# Altium PCB DFMM_2024.PcbDoc (part 2 of 2)
Units mil, origin at the board's own origin, x right, y up, seen from the top; angles counter-clockwise.
Board outline 3287.4 x 3929 mil, 4 copper layers (Top Layer, Top GND, Power Plane, Bottom GND/Signal), stack 23.756 mil thick; 158 components, 100 nets, 537 pads, 256 vias.
Unrouted connection lines stored in the file: 11.
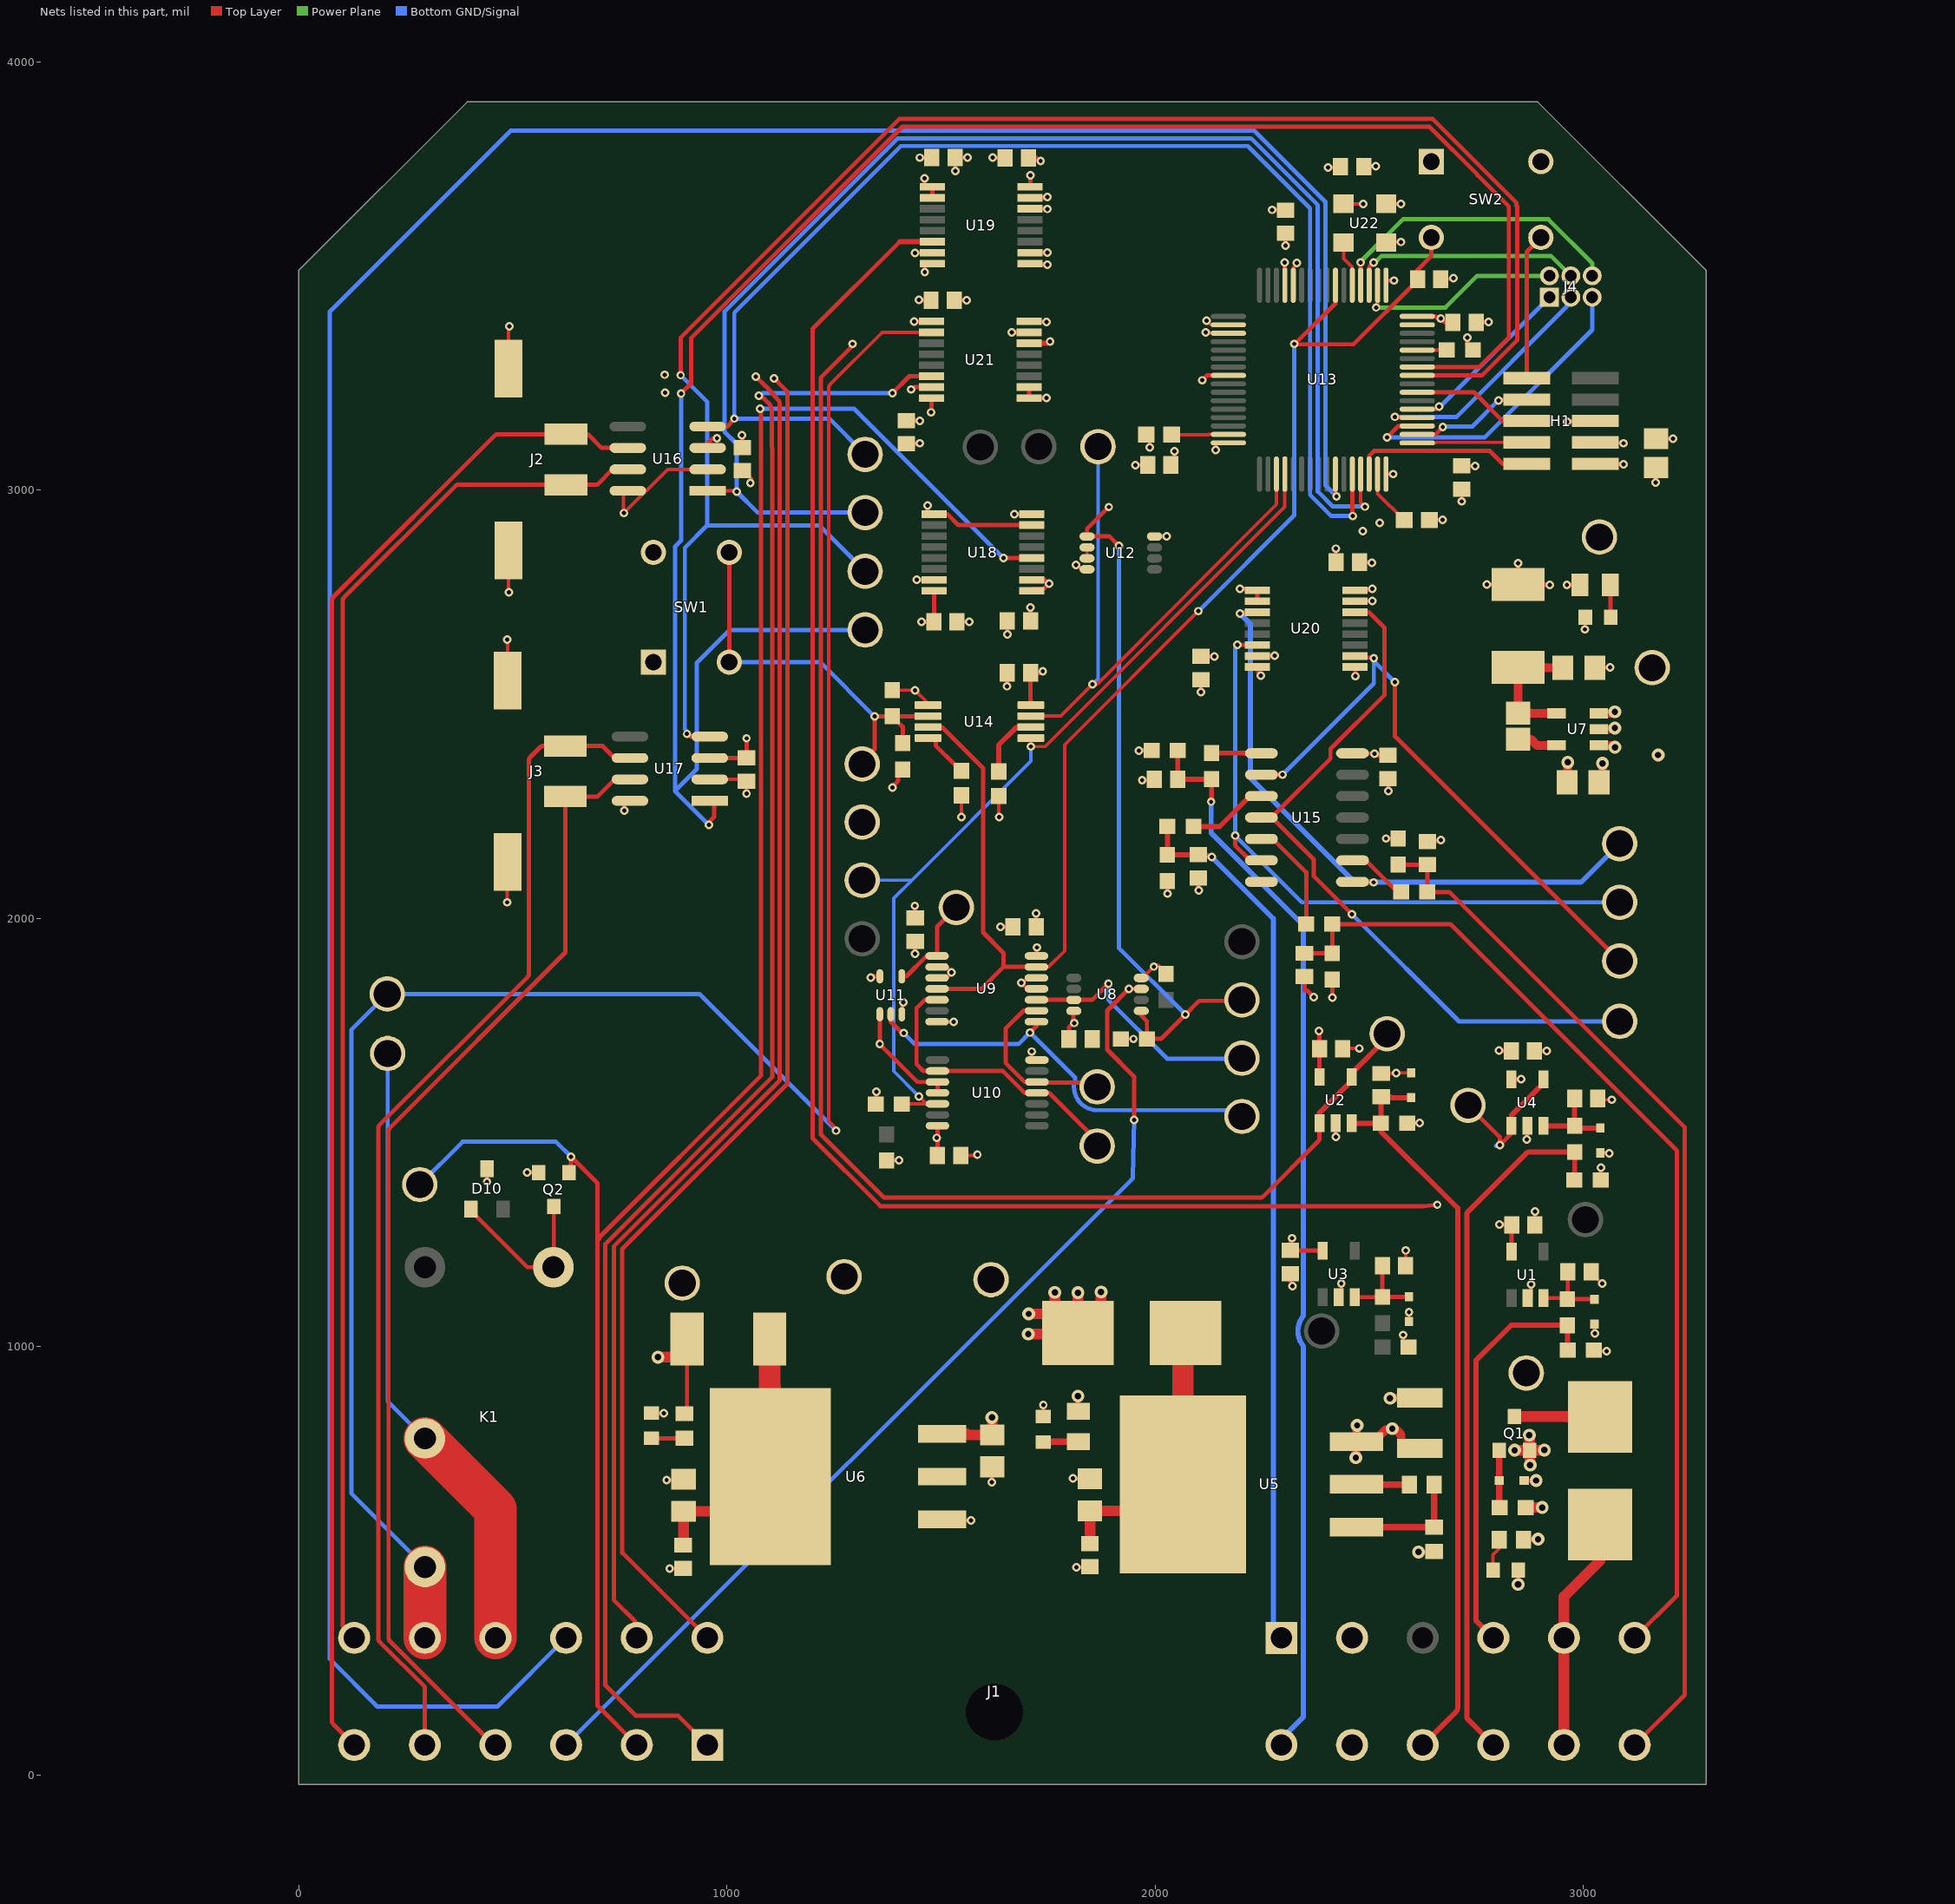
[diagram p3: the nets of this part, all layers, seen from the top]

## Via types
v1: diameter 20, hole 10, Top Layer to Bottom GND/Signal, tented both sides, 229 vias
v2: diameter 30, hole 15, Top Layer to Bottom GND/Signal, tented both sides, 26 vias
v3: diameter 30, hole 16, Top Layer to Bottom GND/Signal, tented both sides, 1 vias

## Nets (pads, with @x,y where several pads share a name; then routed paths per layer and width w, separated by ;. In a path a pad name is that pad's centre, name@x,y a point inside that pad or via, vN(x,y) a via of type N, cw(c..) or ccw(c..) an arc to the next point about the centre after c; other vN are vias at no path point) (continued)
12V_BSPD_FAULT: BSPD.1 U4.1 U4.4 U19.6 | length 4107
  Top Layer w10: 1403.49,3579.49 1200,3376 1200,1486.28 1358.77,1327.51 2625.22,1327.51 ccw(c2625.22,1337.51) 2626.2,1327.56 v1(2659,1330.78) ; BSPD.1@2731,1563 2805,1489 v1(2805,1470) 2829.28,1494.28 ccw(c2822.2,1501.34) 2831.99,1499.33 U4.1@2832.2,1515
  Top Layer w12: 1403.49,3579.49 1479.7,3579.49 U19.6@1479.83,3579.61 ; U4.1@2832.2,1515 2832.2,1539.61 2907,1614.41 U4.4@2907,1623.27
  Bottom GND/Signal w10: v1@2796.31,1468.09 2803.09,1468.09 v1(2805,1470)
12V_IMD_FAULT: IMD.1 U2.1 U2.4 U21.6 | length 3523
  Top Layer w10: v1@1293.78,3336.79 1220,3263.01 1220,1494.57 1367.05,1347.51 2245.37,1347.51 ccw(c2245.37,1357.51) 2252.42,1350.42 2381.28,1479.28 ccw(c2374.2,1486.34) 2384.2,1486.34 U2.1@2384.2,1521
  Top Layer w12: v1@1293.78,3336.79 v1(1293.78,3341) ; U21.6@1706.17,3342.39 1706.37,3342.19 1748.65,3342.19 1752.84,3346.38 v1(1755,3346.38) ; U2.1@2384.2,1521 2384.2,1545.61 2459,1620.41 U2.4@2459,1629.27 2459,1638.13 2542,1721.13 IMD.1@2542,1730
  Bottom GND/Signal w12: v1@1752.84,3346.38 v1(1755,3346.38)
12V_ROT_1_SIG: ROTR1.1 U15.8 U20.3 | length 1487.1
  Top Layer w12: v1(2198.13,2711.62) 2199.61,2713.11 2237.17,2713.11 U20.3@2238.65,2714.59 ; U15.8@2461,2085 2509.04,2085 v1(2510.35,2083.69)
  Bottom GND/Signal w12: v1(2198.13,2711.62) 2223,2686.75 2223,2326.74 2466.04,2083.69 v1(2510.35,2083.69) ; v1@2510.04,2084 2995,2084 ROTR1.1@3085,2174
12V_ROT_2_SIG: ROTR2.1 U15.6 U20.6 | length 1557.8
  Top Layer w10: v1(2187,2193) 2187,2169.83 2221.83,2135 U15.6@2248.4,2135 ; v1(2192.51,2638) 2192.7,2637.82 U20.6@2238.65,2637.82
  Bottom GND/Signal w10: ROTR2.1@3085,2037 2343,2037 v1(2187,2193) 2187,2629.78 v1@2192.51,2635.29 ; v1@2192.51,2635.29 v1(2192.51,2638) v1@2192.51,2635.29
12V_ROT_3_SIG: ROTR3.1 U15.2 U20.10 | length 1401
  Top Layer w10: U15.2@2248.4,2335 v1(2297.79,2335) ; U20.10@2467,2612.23 2491.53,2611 2491.53,2608.54 2509.09,2608.54 v1(2511,2606.62) ; v1(2560,2551) 2560,2425 ROTR3.1@3085,1900
  Bottom GND/Signal w10: v1(2297.79,2335) 2511,2548.21 v1(2511,2606.62) 2512.91,2604.71 2512.91,2598.09 v1(2560,2551)
12V_ROT_4_SIG: ROTR4.1 U15.4 U20.14 | length 1694
  Top Layer w10: U15.4@2248.4,2235 2272,2235 2409.61,2372.61 2409.61,2395.28 2536,2521.66 2536,2678 2499.41,2714.59 U20.14@2467,2714.59 U20.14@2468.3,2713.3 ; U15.4@2273,2235 2371.06,2136.94 2371.06,2097.94 v1(2460,2009)
  Bottom GND/Signal w10: v1(2460,2009) 2710,1759 ROTR4.1@3085,1759
+3V3: +3v3.1 C17.1 C18.1 C19.1 C20.1 C21.1 C22.2 C23.2 C24.2 C25.2 C28.1 C34.1 C38.1 C39.1 C43.1 C44.1 C46.1 C47.2 F4.2 H1.1 R12.2 R23.2 U8.8 U9.14 U10.14 U11.5 U12.8 U13.1 U13.13 U13.19 U13.32 U13.48 U13.64 U14.8 U16.3 U17.3 U18.1 U18.2 U18.7 U18.9 U18.15 U19.16 U20.16 U21.16 U22.1 U22.4 | length 2106.6
  Top Layer w8: U17.3@995.95,2374 U17.3@996.79,2373.17 ; v1(2118.43,3367.64) 2119.55,3366.52 2170.53,3366.52 U13.19@2171.26,3365.8 ; C47.2@2504.17,3756 v1(2515.88,3756) ; U13.48@2539.37,3037.06 2556.22,3037.06 v1(2556.28,3037) ; U22.4@2540,3577.72 2541.28,3579 v1(2574.62,3579) ; U22.1@2540,3668.28 2564.62,3668.28 2564.9,3668 v1(2574.62,3668) ; C25.2@2716,3056.33 2737.47,3056.33 2737.8,3056 v1(2747.47,3056) v1@2747.14,3056.33
  Top Layer w10: U16.3@955.06,3098 955.06,3102.02 957,3103.97 957,3110.46 966,3119.46 976,3119.46 v1(977,3120.46) ; U17.3@960.06,2374 995.95,2374 1024.36,2374 1024.53,2374.17 C38.1@1046,2374.17 v1(1046,2420) ; v1(1035,3127.88) 1036,3126.88 C34.1@1036,3099.17 ; v1(1336,1861) 1338.71,1861 1342,1864.29 U11.5@1357.41,1864.29 ; v1(1387,2305) 1387,2307 1400.43,2320.43 1400.43,2333.79 1401.2,2334.56 R23.2@1414.56,2334.56 ; C44.1@1419,3162.17 1449.31,3162.17 v1(1450.47,3161) ; C18.1@1434.41,1943 1439.66,1937.75 v1(1439.66,1917.12) ; v1(1443.3,2790) 1453.28,2790 U18.15@1483.83,2790.02 ; v1(1469.01,2963.43) 1469.01,2947.43 1472.87,2943.57 1515.01,2943.57 1540.6,2917.98 U18.7@1712.17,2917.98 ; v1(1477,3181) 1477.83,3181.83 U21.16@1477.83,3214.43 U21.16@1478,3210.57 ; C19.1@1491.83,1446 1491.83,1485.17 v1(1490,1487) 1491.86,1488.86 U10.14@1491.86,1515.23 ; C43.1@1704.17,3775 1724.33,3775 1731.33,3768 v1(1732.88,3768) ; U19.16@1708.17,3707.57 1709,3708.39 v1(1709,3735) ; v1(1709,2725.47) 1709.33,2725.14 C46.1@1709.33,2694 ; U18.1@1709.33,2761.59 U18.1@1712.17,2764.43 ; U14.8@1710.08,2497.39 1710.08,2507.24 1709.17,2508.16 C28.1@1709.17,2573 1710.17,2572 1730.62,2572 1733.09,2574.46 1735.97,2574.46 v1(1737.88,2576.38) ; U18.2@1712.17,2790.02 1742.7,2790.02 1751.21,2781.51 v1(1752.7,2781.51) 1739.48,2768.29 U18.1@1716.03,2768.29 ; v1(1722,2011.47) 1722.33,2011.14 C20.1@1722.33,1980 ; U9.14@1722.33,1915.72 ccw(c1732.33,1915.72) U9.14@1723.14,1911.77 1723.14,1930.77 v1(1724,1931.63) ; C17.1@1798.83,1718 1798.83,1744.61 v1@1809.5,1755.27 ; U8.8@1810.26,1783.61 1809.5,1782.85 v1@1809.5,1755.27 ; v1(1811,1755.27) v1@1809.5,1755.27 ; U12.8@1998.74,2891.39 1999.05,2891.7 2027.13,2891.7 v1(2027.45,2892.01) ; C23.2@2036.98,3058.5 2045.75,3067.27 v1(2045.75,3089.97) ; v1(2142,3092.98) 2142,3109.05 2142.84,3109.89 U13.32@2171.26,3109.89 ; v1(2302.8,3531.24) 2302.8,3478.35 U13.13@2303.15,3478 ; v1(2305,3570.45) C22.2@2305,3599.17 ; U20.16@2467,2765.77 2497.53,2765.77 2498.84,2767.09 2505.61,2767.09 v1(2507.53,2769) ; C39.1@2477.33,2831.41 2504.64,2831.41 v1(2506.05,2830) ; U13.1@2539.37,3442.57 2539.37,3489 2539.37,3492.84 2539.37,3489.84 2540.21,3489 v1(2558,3489) ; U13.64@2612.32,3405.05 U13.64@2612.2,3405.17 2654.54,3405.17 2657.8,3401.91 2665.2,3401.91 v1(2667.12,3400) 2668.12,3400 2677.12,3391 C24.2@2695.83,3391 ; v1(2774.99,2779) 2847.91,2779 F4.2@2848,2778.91 ; v1(2848,2828.5) F4.2@2848,2778.91 ; v1(2922,2778) 2911.92,2778 2911.01,2778.91 F4.2@2848,2778.91 ; v1(2961.88,2778) R12.2@2992.57,2778 ; H1.1@3028,3061 3093,3061 v1(3094,3060) ; v1(3169,3016.93) 3170,3017.93 C21.1@3170,3052.54
+5V: +5V.1 C15.1 F2.2 R13.1 U7.1 U7.3 | length 377.2
  Top Layer w10: R13.1@901,843 907.09,849.09 F2.2@907.09,993.57
  Top Layer w20: U7.1@3036.21,2403.6 3066.7,2403.6 3071.29,2399 v2(3074,2399) ; U7.3@3036.21,2478.4 3067.4,2478.4 3069.09,2480.09 3071.95,2480.09 v2(3073.87,2482) ; C15.1@3037,2317 3045,2325 v2(3045,2361.54)
  Top Layer w25: v2(839,975) 881,975 907.09,993.57 F2.2@907.09,1017
  other v2: 3175,2381
+12V: +12V.1 C5.2 C6.2 C7.2 C8.2 C12.1 C37.2 C40.1 C41.2 C42.2 C45.2 D10.3 F1.2 R11.2 R26.1 R27.1 R30.1 R31.1 U1.5 U2.5 U3.5 U4.5 U6.3 U15.14 U18.16 U19.1 U19.2 U19.7 U19.9 U19.15 U20.1 U20.2 U20.7 U20.9 U20.15 U21.1 U21.2 U21.7 U21.9 U21.15 | length 1854.3
  Top Layer w10: v1(440,1384.56) D10.3@440,1415.24 ; v1(1430.56,3234.6) 1433.27,3234.6 1438.7,3240.02 U21.15@1477.83,3240.02 ; v1(1437.3,3393) 1437.87,3393.57 U21.9@1477.83,3393.57 ; v1(1439.3,3553) 1440.32,3554.02 U19.7@1479.83,3554.02 ; v1(1448.28,3444) 1449.28,3443 C42.2@1477,3443 ; v1(1450.28,3775.78) 1450.5,3776 C41.2@1479,3776 ; v1(1454.45,2692) C45.2@1483.17,2692 1483.83,2692.66 U18.16@1483.83,2764.43 ; v1@1462,3728.89 1462,3711.43 1465.86,3707.57 U19.1@1479.83,3707.57 U19.2@1479.83,3681.98 ; v1@1665.67,3367.98 U21.7@1706.17,3367.98 ; U21.2@1706.17,3240.02 U21.1@1706.17,3214.43 1746.13,3214.43 v1(1746.7,3215) ; U19.9@1708.17,3528.43 1709.39,3527.22 1747.48,3527.22 v1(1748.7,3526) ; U19.15@1708.17,3681.98 1743.97,3681.98 1745.99,3684 v1(1748.7,3684) ; v2(1820,884.12) 1820,849.43 R11.2@1821,848.43 ; v1(1962.28,2391) 1963.28,2392 R27.1@1991.98,2392 ; v1(2029,2057.28) R26.1@2029,2086.98 ; C40.1@2107.03,2611.13 2107.17,2611 v1(2138.47,2611) ; v1(2198.13,2769.38) 2235.05,2769.38 U20.1@2238.65,2765.77 U20.2@2238.65,2740.18 ; U20.7@2238.65,2612.23 2278.41,2612.23 v1(2279.18,2613) ; v1(2320,1252.88) 2318.09,1250.97 2318.09,1244.09 2316,1242 C7.2@2316,1224.17 2377.88,1224.17 2378.79,1223.26 U3.5@2391.6,1223.26 ; v1(2383,1737) 2383.83,1736.17 C6.2@2383.83,1695 2383.83,1651.3 2384.2,1650.94 U2.5@2384.2,1629.27 ; v1(2414,1815) R30.1@2414,1856.98 ; U15.14@2461,2385 2461.39,2384.61 2512.13,2384.61 v1(2512.53,2384.21) 2515.23,2384.21 2519.28,2380.17 C37.2@2544,2380.17 ; U20.9@2467,2586.64 2468,2585.64 v1(2468,2565) ; U20.15@2467,2740.18 2506.71,2740.18 v1(2507.53,2741) ; v1(2539.28,2186) 2549,2186 R31.1@2568,2186.02 ; v1(2802.95,1691) 2803.95,1690 C8.2@2831.67,1690 ; v1(2803.95,1285) 2831.67,1285 C5.2@2832.67,1284 2832.67,1262.53 2832.6,1262.46 U1.5@2832.6,1221.26 ; U4.5@2832.2,1623.27 2854.28,1623.27 v1(2855.01,1624)
  Top Layer w25: U6.3@1503.09,796 1560.2,796 1562.8,793.4 C12.1@1620,793.4 1620,823 1619.96,823.04 1619.96,833.05 v2(1619,834.01) ; v2(1704,1029) F1.2@1774,1029 ; v2(1705,1076) F1.2@1776,1076 ; F1.2@1766,1105 v2(1766,1126) ; F1.2@1819.82,1031 v2(1819.82,1125.49) ; F1.2@1874,1075 v2(1874,1127)
  other v1: 1665.65,3368 1462,3727.43
+24V: +24V.1 C9.2 D9.1 Q1.2 R10.1 U5.3 | length 468.8
  Top Layer w10: R10.1@2860.54,549 2893.54,549 v2(2894.54,550) ; D9.1@2861.94,687 v2(2890,687)
  Top Layer w20: v2(2469,740.35) 2469,776.49 U5.3@2470.51,778 ; v2(2472,815.65) 2470.51,814.17 U5.3@2470.51,778 ; C9.2@2618,761.94 2587.49,761.94 2574.85,774.58 2574.85,793.76 2562.52,806.09 2555.91,806.09 v2(2554,808) 2552.09,806.09 2538.95,806.09 2510.87,778 U5.3@2470.51,778
  Top Layer w25: v2(2839.82,757.63) Q1.2@2874.43,757.63 ; v2(2874,793) 2874.43,792.57 Q1.2@2874.43,757.63 ; v2(2876,723) 2874.98,752.41 Q1.2@2874.43,757.63 ; v2(2909,758) 2908.63,757.63 Q1.2@2874.43,757.63
+24V_IN: F3.1 J1.B5 J1.B8 | length 549.8
  Top Layer w25: J1.B8@2955.04,69.39 J1.B5@2955.04,319.39 2955.04,415.98 3039,499.94 F3.1@3039,584.41
\u\R\S\T\: C29.2 H1.10 SW2.3 SW2.4 U9.4 U9.13 U13.7 U14.3 | length 3610
  Top Layer w8: U9.13@1723.14,1886.18 1751.7,1886.18 1789.1,1923.58 1789.1,2404.82 v1(2101.28,2717)
  Top Layer w10: U14.3@1469.92,2446.2 1502.42,2446.2 1598.5,2350.12 1598.5,1966.5 1646,1919 1646,1886.18 ; U9.4@1490.86,1835 1594.82,1835 1646,1886.18 ; U9.13@1723.14,1886.18 1646,1886.18 ; U13.7@2421.26,3478 2421.26,3435.52 2326.74,3341 v1(2325,3341) 2326,3340 2463.59,3340 2612.83,3489.24 C29.2@2612.83,3492 2612.83,3513.47 2645.05,3545.68 SW2.3@2645.05,3589.42 ; U13.7@2421.26,3514.27 U13.7@2422.04,3513.49 ; H1.10@2868,3261 2868,3555.46 SW2.4@2900.95,3588.42
  Bottom GND/Signal w10: v1(2101.28,2717) 2325,2940.72 v1(2325,3341)
\W\D\O\: R18.1 U10.12 U13.36 U14.5 WDO.1 | length 2100.5
  Top Layer w8: 1427.85,1566.41 1463.3,1566.41 ; v1(1449,1584) 1463.3,1569.7 1463.3,1566.41 ; U10.12@1491.86,1566.41 1463.3,1566.41 ; v1(1710,2400.76) v1@1710,2405 ; U14.5@1710.08,2420.61 1710,2420.54 v1@1710,2405 ; U13.36@2303.15,3037.06 2303.15,2960.54 1743.36,2400.76 1714.24,2400.76 v1@1710,2405
  Bottom GND/Signal w8: WDO.1@1316,2088.67 1432.07,2088.67 ; v1(1449,1584) 1390.03,1642.97 1390.03,2046.63 1432.07,2088.67 ; v1(1710,2400.76) 1710,2366.59 1432.07,2088.67
ANL_1: J1.A11 U19.14 | length 3191.7
  Top Layer w10: J1.A11@789.69,319.39 786.14,322.93 786.14,357.79 736,407.93 736,1233.46 1123.78,1621.24 1123.78,3012.21 ; v1(1067.76,3264.24) 1092.73,3240.37 1120.44,3209.54 cw(c1113,3202.86) 1123,3202.86 1123.78,3012.26 ; U19.14@1708.17,3656.39 1708.37,3656.19 1748.51,3656.19 v1(1748.7,3656)
  Bottom GND/Signal w10: v1@1747.7,3657 v1(1748.7,3656)
ANL_2: J1.A12 U19.10 | length 3236.4
  Top Layer w10: J1.A12@954.65,319.39 756,518.03 756,1228 1142,1614 1142,3224.44 1142,3224.49 ccw(c1132,3224.38) 1139.1,3231.43 1134.14,3236.41 1130.89,3239.69 v1(1110.41,3260.56) ; U19.10@1708.17,3554.02 v1(1748.7,3554)
AS_CLOSE_SDC: "SDC CLS.1" R15.1 U8.1 U12.1 U13.24 | length 1726.9
  Top Layer w10: v1(1892,2960) 1841.26,2909.26 U12.1@1841.26,2891.39 1893.7,2891.39 v1(1915.47,2869.61) ; U8.1@1967.74,1783.61 1967.74,1772.97 1981,1759.71 R15.1@1981,1718 ; R15.1@1981.98,1718 2014,1718 v1(2071,1775) 2103,1807 2203,1807 ; v1(2110,3256) 2121.37,3267.37 U13.24@2171.26,3267.37
  Bottom GND/Signal w10: v1(1915.47,2869.61) 1915.47,1930.53 v1(2071,1775)
AS_SDC_FAULT: "AS SDC FLT.1" J1.A2 Q2.1 U18.4 | length 4760.2
  Top Layer w10: 260,1376 260.5,1375.5 ; Q2.1@631.43,1405.37 636,1418.09 v1(636,1443) 698,1381 698,161.07 J1.A2@789.69,69.39 ; 702,1250.37 702,1254.37 1079.47,1631.84 1079.47,3188.18 v1(1078,3189.65) ; v1(1646,2841) 1646.2,2841.2 U18.4@1712.17,2841.2
  Bottom GND/Signal w10: 283,1378 383,1478 601,1478 v1(636,1443) ; v1(1078,3189.65) 1297.35,3189.65 v1(1646,2841)
ASSI_TX: J1.A10 U13.42 | length 7131.1
  Top Layer w10: U13.42@2421.26,3037.06 2421.26,2990.15 2423.8,2987.61 v1(2423.8,2984.91)
  Bottom GND/Signal w10: J1.A10@624.72,319.39 464.34,159 184,159 73,270 73,3416.54 495.46,3839 2231.46,3839 2398,3672.46 2398,3010.71 v1(2423.8,2984.91)
BMS_FAULT: J1.B4 R1.1 R2.2 | length 971
  Top Layer w12: J1.B4@2790.08,319.39 2749.3,360.17 2749.3,967.3 2831.5,1049.5 2944.22,1049.5 2944.29,1049.43 R1.1@2963.01,1049.43 ; R1.1@2963.01,1049.43 2963.03,1002.72 R2.2@2963.49,991
BSPD_FAULT: J1.B9 R6.1 R7.2 | length 1642.8
  Top Layer w12: J1.B9@2790.08,69.39 2731.51,127.95 cw(c2740,136.44) 2728,136.39 2728,1307.03 cw(c2740,1307.03) 2731.51,1315.51 2866.49,1450.49 cw(c2874.95,1441.98) 2874.95,1453.98 R6.1@2980,1453.98 2980,1408.23 2979.49,1407.72 R7.2@2979.49,1389
CAN1_N: J1.A7 J2.1 U16.7 | length 3225.1
  Top Layer w10: J1.A7@129.84,319.39 105.91,343.32 cw(c113,350.37) 103,350.37 103,2741.86 cw(c113,2741.86) 105.93,2748.93 366.02,3009.02 cw(c373.09,3001.95) 373.09,3011.95 J2.1@624.65,3011.95 697,3011.95 733.05,3048 758.65,3048 U16.7@753.06,3042.4
CAN1_P: J1.A6 J2.2 U16.6 | length 3550.4
  Top Layer w10: J1.A6@129.84,69.39 80.93,118.3 cw(c88,125.37) 78,125.37 78,2742.86 cw(c88,2742.86) 80.91,2749.91 458.13,3127.13 cw(c465.21,3120.06) 465.21,3130.06 J2.2@624.65,3130.06 675.65,3130.06 707.71,3098 U16.6@758.65,3098
CAN1_RX: "C1 RX.1" U13.44 U16.4 | length 3103.7
  Top Layer w10: U16.4@965.35,3148 992.76,3148 1001.05,3148 1006.9,3153.86 1016.54,3166.65 v1(1017.54,3166.65) ; U13.44@2460.63,3037.06 2460.98,3036.71 2460.98,2939.93 v1(2462,2938.91)
  Bottom GND/Signal w10: v1@1016.54,3166.65 v1@1017.54,3167.65 ; 1323,3083 1239.35,3166.65 v1(1017.54,3166.65) 1017.54,3413.68 1406.86,3803 2216.54,3803 2362,3657.54 2362,2988.72 2411.81,2938.91 v1(2462,2938.91)
CAN1_TX: "C1 TX.1" U13.45 U16.1 | length 3301.9
  Top Layer w8: U16.1@965.35,2998 1021,2998 v1(1023,2996) ; U13.45@2480.31,3037.06 2480.31,2970.69 v1(2490,2961)
  Bottom GND/Signal w10: 1323,2947 1072,2947 v1(1023,2996) 1023,3107.36 994.54,3135.82 994.54,3416.14 1399.4,3821 2224,3821 2380,3665 2380,2996.18 2414.27,2961.91 2489.09,2961.91 v1(2490,2961)
CAN2_N: J1.A4 J3.1 U17.7 | length 2647.9
  Top Layer w10: J1.A4@459.76,69.39 455.71,69.39 212.93,312.16 cw(c220,319.24) 210,319.24 210,1502.86 cw(c220,1502.86) 212.93,1509.93 623,1920 J3.1@623,2284 698.05,2284 738.05,2324 U17.7@763.65,2324
CAN2_P: J1.A5 J3.2 U17.6 | length 2741.7
  Top Layer w10: J1.A5@294.8,69.39 294.8,204.83 188.93,310.71 cw(c196,317.78) 186,317.78 186,1509.86 cw(c196,1509.86) 188.93,1516.93 535.07,1863.07 ccw(c528,1870.14) 538,1870.14 538,2368.86 cw(c548,2368.86) 540.9,2375.9 564.17,2399.17 cw(c571.25,2392.11) 571.25,2402.11 J3.2@623,2402.11 709.94,2402.11 738.05,2374 U17.6@763.65,2374
CAN2_RX: "C2 RX.1" U13.57 U17.4 | length 4287.9
  Top Layer w10: v1(892,3268) 892,3355.46 1402.54,3866 2648.45,3866 2844,3670.45 2844,3664 2846,3662 2846,3350.23 2763.14,3267.37 U13.57@2612.2,3267.37 U13.57@2612.55,3267.02 ; v1(907,2430.25) 909.71,2430.25 915.95,2424 U17.4@970.35,2424
  Bottom GND/Signal w10: v1(892,3268) 954,3206 954,2917 ; v1(907,2430.25) 905.33,2431.92 905.33,2437.67 902,2441 902,2865 954,2917 ; 1323,2810 1216,2917 954,2917
CAN2_TX: "C2 TX.1" U13.58 U17.1 | length 4721.6
  Top Layer w10: v1(893,3225) 893,3225.24 917,3249.24 917,3355 1410,3848 2640.99,3848 2752.96,3736.03 2752.96,3735.04 2826,3662 2826,3355.69 2757.37,3287.06 U13.58@2612.2,3287.06 ; v1@961.36,2227.39 970.35,2236.38 U17.1@970.35,2274
  Bottom GND/Signal w10: v1(893,3225) 893,2881.46 879,2867.46 879,2297 ; v1@959,2219 v1(958,2218) 879,2297 ; 1323,2673 1007,2673 930,2596 930,2348 879,2297
EBS_LED: J1.A3 U8.3 | length 2385.8
  Top Layer w8: v1(1939.03,1835.13) 1939.36,1834.8 U8.3@1967.74,1834.8
  Top Layer w10: v1(1939.03,1835.13) 1888.28,1784.38 1888.28,1693.05 1951,1630.33 v1(1950.98,1528.66)
  Bottom GND/Signal w10: J1.A3@624.72,69.39 1945.23,1389.89 1948.07,1392.73 ; 1948.16,1396.75 v1(1950.98,1528.66)
GND: C1.1 C2.1 C3.1 C4.1 C5.1 C6.1 C7.1 C8.1 C9.1 C10.2 C11.1 C12.2 C13.2 C14.1 C15.2 C16.2 C17.2 C18.2 C19.2 C20.2 C21.2 C22.1 C23.1 C24.1 C25.1 C26.2 C27.2 C28.2 C29.1 C30.2 C31.2 C32.1 C33.1 C34.2 C35.1 C36.1 C37.1 C38.2 C39.2 C40.2 C41.1 C42.1 C43.2 C44.2 C45.1 C46.2 C47.1 D1.2 D2.2 D3.2 D4.2 D5.2 D6.2 D7.2 D8.2 GND2.1 GND.1 H1.3 H1.5 J1.B2 J1.B11 J2.3 J2.4 J3.3 J3.4 Q2.2 R2.1 R3.1 R5.1 R7.1 R9.2 R14.1 R15.2 R16.2 R17.2 R18.2 R24.1 R25.1 SW1.1 SW1.2 SW2.1 SW2.2 U1.2 U2.2 U3.2 U4.2 U6.1 U7.2 U8.4 U9.2 U9.3 U9.7 U9.11 U9.12 U10.7 U11.3 U12.4 U13.12 U13.18 U13.63 U14.1 U15.7 U16.2 U16.8 U17.2 U17.8 U18.8 U19.8 U20.8 U21.8 U22.2 | length 4215.4
  Top Layer w8: v1(487,2037) 487,2129.69 J3.4@488.35,2131.05 ; v1(487.2,2650.87) 488.35,2649.72 J3.3@488.35,2555.06 ; J2.4@490,2859 490,2762 v1(491,2761) ; J2.3@490,3283.02 490,3380 v1(492,3382) ; v1(533.82,1406) 559.94,1406 Q2.2@560.57,1405.37 ; U16.8@758.65,2998 758.65,2947.35 v1(760,2946) 862,3048 U16.2@965.35,3048 ; v1(761,2251.54) 761,2271.35 U17.8@763.65,2274 ; D7.2@824,844.57 824.57,844 v1(852.72,844) ; v1(859.46,688) 897.2,688 C13.2@899,689.8 ; v1(866.53,481) 867.2,481.67 C14.1@898,481.67 ; U17.2@960.06,2324 1041.83,2324 1050,2315.83 1046,2311.83 v1(1046,2291.12) ; C34.2@1036,3044.83 1038.76,3044.83 1057.18,3026.41 1057.18,3018.3 v1(1055,3016.12) ; R18.2@1347.98,1566 1347.98,1593.69 v1(1349,1594.72) ; R17.2@1373,1433.98 1374.02,1435 v1(1401.72,1435) ; R24.1@1386,2532.51 1439.1,2532.51 v1(1439.62,2531.99) 1469.37,2502.24 U14.1@1469.92,2497.39 ; U11.3@1408.59,1775.71 1410.07,1777.19 1410.07,1801.47 v1(1412.03,1803.43) ; v1(1462.35,3508.57) 1462.35,3523.57 1467.21,3528.43 U19.8@1479.83,3528.43 U19.8@1502.62,3523.57 ; U9.7@1490.86,1758.23 1491,1758.09 1529.28,1758.09 v1(1529.42,1757.95) ; U9.3@1490.86,1860.59 1512.19,1860.59 1516.92,1865.32 1518.2,1865.32 1521.83,1868.95 1521.83,1872.17 1520,1874 1521.56,1875.56 1521.56,1878.09 1518.2,1881.45 1516.92,1881.45 1512.19,1886.18 U9.2@1490.86,1886.18 ; U6.1@1503.09,596 1505.09,594 v1(1570.2,594) ; v1@1519.42,1876.26 1522.03,1873.65 v1(1524.97,1873.65) ; C42.1@1531.33,3443 v1(1560.05,3443) ; v1(1534,3744.53) 1534,3775.33 C41.1@1533.33,3776 v1(1562.05,3776) ; C45.1@1537.5,2692 v1(1566.21,2692) ; C19.2@1546.17,1446 1583,1446 v1(1585,1448) ; C26.2@1548,2286.78 1548,2236.26 v1(1548.28,2235.98) ; v1(1619,682.99) 1619,717.6 C12.2@1620,718.6 ; v1(1621.12,3776) 1622.12,3775 C43.2@1649.83,3775 C43.2@1648.83,3776 ; C27.2@1635,2285.39 1635,2237 v1(1636,2236) ; v1(1639.28,1980) C20.2@1668,1980 ; v1(1655,2662.53) C46.2@1655,2694 ; v1(1671.65,2943) 1672.21,2943.57 U18.8@1712.17,2943.57 ; U21.8@1706.17,3393.57 1745.13,3393.57 v1(1746.7,3392) ; v1(1712,1688.63) 1712,1673.26 1716.49,1668.77 U10.7@1724.14,1668.77 ; U9.11@1723.14,1835 1701.81,1835 1697.08,1839.73 1695.8,1839.73 1688,1847.53 v1(1688,1849) 1690.43,1849 1702.02,1860.59 U9.12@1723.14,1860.59 ; D6.2@1739,836.15 v1(1739,862.9) ; v1(1808.46,692) 1809.46,691 C10.2@1848,691 ; v1(1815.14,2824.68) 1817.6,2822.22 1820.51,2822.22 1824.37,2818.36 1826.48,2818.36 1827.99,2816.85 1839.02,2816.85 U12.4@1841.26,2814.61 ; v1(1816.53,484) 1846.33,484 C11.1@1848,485.67 ; R15.2@1919.98,1718 v1(1949.68,1718) ; v1(1953.93,3058) 1954.43,3058.5 C23.1@1982.65,3058.5 ; U8.4@1967.74,1860.39 1972.45,1860.39 1980.59,1868.52 1980.59,1870.3 1999.58,1889.3 2007.44,1889.3 2007.58,1889.43 2026,1871.01 R16.2@2026,1870.02 ; v1(1969.95,2322) 1996.67,2322 C33.1@1998.67,2324 ; C31.2@1979.47,3129 1988,3120.47 v1(1988,3099.3) ; v1(2107,2528.12) C40.2@2107,2556.83 C40.2@2107.83,2556 ; v1(2120.72,3395.55) 2120.72,3394.95 2128.41,3387.26 2129.93,3387.26 2130.98,3386.21 2170.53,3386.21 U13.18@2171.26,3385.48 ; U20.8@2238.65,2586.64 2238.65,2575.13 v1(2247,2566.78) ; C7.1@2316,1169.83 2316,1151 2318.7,1148.3 2318.7,1143.41 v1(2321,1141.12) ; U13.12@2322.83,3478 2322.83,3519.13 2330.93,3527.22 v1(2330.93,3530.34) ; v1(2404.12,3753) 2430.83,3753 C47.1@2432.83,3755 ; U2.2@2421.6,1521 2421.6,1489.73 v1(2422,1489.33) ; v1(2422,2862.88) 2422,2832.41 C39.2@2423,2831.41 ; U3.2@2429,1114.99 2435,1120.99 v1(2435,1146.66) ; C6.1@2438.17,1695 2438.87,1695.71 v1(2477.29,1695.71) ; U22.2@2440,3668.28 2440.28,3668 v1(2486,3668) ; C2.1@2528,1637.33 2562.58,1637.33 v1(2563.25,1638) 2564.13,1638.87 D2.2@2598,1638.87 ; C37.1@2544,2325.83 2545,2324.83 v1(2545,2297.12) ; v1(2579,1026.84) 2579,1011.13 R5.1@2592,998.13 ; C3.1@2585.35,1188.36 v1(2585.35,1224.35) ; R3.1@2588.51,1521 2589.51,1522 v1(2618.21,1522) ; D3.2@2592,1051.36 D3.2@2593,1058.19 v1(2593,1080.02) ; v2(2615.33,520) 2651,520 R9.2@2652,521 ; C30.2@2644,2927 C30.2@2641,2930 v1(2671.69,2930) ; C29.1@2667.17,3492 2690.77,3492 2693.28,3494.51 v1(2696.53,3494.51) ; v1(2716,2973.28) C25.1@2716,3002 ; v3(2848,444.28) 2848.57,444.86 D5.2@2848.57,478 ; v1(2868,1483.33) 2869.6,1484.93 U4.2@2869.6,1515 ; U1.2@2870,1112.99 2877.81,1120.8 2877.81,1134.16 2878,1134.35 v1(2878,1144.66) ; C8.1@2886,1690 C8.1@2887,1691 ; C5.1@2887,1284 v1(2887,1315.47) ; v1(2962,3159) 2964,3161 H1.5@3028,3161 ; v1(3004,2674.28) 3004.85,2675.13 D8.2@3004.85,2703 D8.2@3016.6,2689.28 ; C1.1@3018.13,1174.43 3018.13,1171.67 3042.83,1146.96 v1(3044.34,1146.96) ; R2.1@3024.51,991 3026.51,989 v1(3054.21,989) ; D1.2@3026,1052.19 3026,1040.36 3027,1039.36 v1(3027,1030.36) ; C16.2@3027,2585 3052.61,2585 3053.61,2586 v1(3062.61,2586) ; H1.3@3028,3111 3092,3111 v1(3094,3109) ; C4.1@3034,1579 3047.72,1576 v1(3067,1576) ; R7.1@3040,1389.51 R7.1@3040.51,1389 3040.51,1417.23 v1(3041,1417.72) ; D4.2@3040,1452.06 3040.47,1452.53 3059.31,1452.53 v1(3060.84,1451) ; C21.2@3170,3119.46 3209.01,3119.46 v1(3209.54,3120)
  Top Layer w10: C44.2@1419,3107.83 1449.31,3107.83 v1(1450.47,3109) ; v1(1439,2028.88) 1439,2001.17 C18.2@1440,2000.17 ; v1(1654,2541.53) 1654,2550.69 1654.83,2551.53 C28.2@1654.83,2573 ; C32.1@2101,2093.67 2101,2065.95 v1(2102,2064.95) ; v1(2273.53,3654) 2273.84,3653.69 2304.8,3653.69 C22.1@2305,3653.5 ; C35.1@2349,1863.67 2349,1831 2349.05,1830.95 2355.65,1830.95 v1(2370.6,1816) ; C36.1@2636,2179.33 2660.61,2179.33 2661.44,2180.15 2665.56,2180.15 v1(2667.47,2182.07) ; v1(2729,3355.72) 2729,3339.72 2741.72,3327 R25.1@2742.51,3327 ; C24.1@2750.17,3391 2751.17,3392 v1(2778.88,3392) ; C8.1@2887,1691 2888,1690 v1(2914.72,1690)
  Top Layer w20: v2(2548.85,879) 2549.91,880.06 C9.1@2618,880.06 ; C15.2@2962.2,2317 2963.1,2317.9 2963.1,2363.1 v2(2964,2364) ; U7.2@3036.21,2441 3058.62,2441 3059.71,2442.09 3071.95,2442.09 v2(3073.87,2444)
  Top Layer w25: R14.1@2866.02,624 v2(2904,624)
  other v1: 1997.28,1887 2485,2904 2525,2923 856,3227 855,3269
IMD_FAULT: C2.2 D2.1 J1.B10 R3.2 U2.3 | length 1760.6
  Top Layer w12: U2.3@2459,1521 R3.2@2527.49,1521 ; D2.1@2598,1581 2551.47,1581 2549.47,1583 C2.2@2528,1583 2528,1564.28 2527.49,1563.77 R3.2@2527.49,1521 ; J1.B10@2625.12,69.39 2703.18,147.45 ccw(c2694.67,155.91) 2706.67,155.91 2706.67,1323.1 2527.49,1502.28 R3.2@2527.49,1521
JTDI: H1.8 U13.50 | length 289.6
  Top Layer w10: U13.50@2612.2,3129.57 2654.69,3129.57 2672,3146.89 v1(2672,3147) ; v1(2802,3209) 2804.71,3209 2806.71,3211 H1.8@2868,3211
  Bottom GND/Signal w10: v1(2672,3147) 2673.06,3148.06 2741.06,3148.06 v1(2802,3209)
"NetAS TS_1": "AS TS.1" U8.7 U9.10 | length 590.2
  Top Layer w10: U9.10@1723.14,1809.41 1751.7,1809.41 1751.91,1809.2 1853.2,1809.2 v1(1891,1847)
  Bottom GND/Signal w10: v1(1891,1847) 1891,1809.2 2028.2,1672 2203,1672
NetC1_2: C1.2 D1.1 R1.2 U1.3 | length 184.1
  Top Layer w10: U1.3@2907.4,1112.99 2960.46,1112.99 R1.2@2963.01,1110.45 ; C1.2@2963.8,1174.43 2963.8,1130.94 2963.01,1130.15 R1.2@2963.01,1110.45 ; D1.1@3026,1110.06 3015.16,1110.06 3014.77,1110.45 R1.2@2963.01,1110.45
NetC3_2: C3.2 D3.1 R4.2 U3.3 | length 199.1
  Top Layer w10: U3.3@2466.4,1114.99 2511.76,1114.99 2512.3,1115.53 R4.2@2531.02,1115.53 ; C3.2@2531.02,1188.36 R4.2@2531.02,1115.53 ; D3.1@2592.46,1115.53 R4.2@2531.02,1115.53
NetC4_2: C4.2 D4.1 R6.2 U4.3 | length 198.2
  Top Layer w12: U4.3@2907,1515 R6.2@2980,1515 ; C4.2@2979.67,1579 2979.67,1535.03 2980,1534.7 R6.2@2980,1515 ; D4.1@3040,1509.94 2991.72,1509.94 R6.2@2980,1515
NetC10_1: C10.1 C11.2 F1.1 R8.1 U5.2 U5.4 | length 796.3
  Top Layer w15: U5.4@2003.2,616.2 U5.4@2065,678 ; U5.2@2470.51,678 2533.52,678 2533.98,677.54 R8.1@2594.46,677.54
  Top Layer w25: C11.2@1848,540 C10.1@1848,616.2 U5.4@2003.2,616.2
  Top Layer w50: U5.4@2065,678 2065,981 F1.1@2071,1031
NetC13_1: C13.1 C14.2 F2.1 U6.2 U6.4 | length 637.1
  Top Layer w15: C14.2@898,536 898,554.72 899,555.72 ; U6.4@1020.52,615 U6.4@1101.52,696
  Top Layer w25: 899,555.72 C13.1@899,615 U6.4@1020.52,615
  Top Layer w50: F2.1@1100,1017 1100,905.21 1101.52,903.69 U6.4@1101.52,696
NetC16_1: C16.1 F4.1 L1.2 U7.4 | length 301.6
  Top Layer w20: U7.4@2937.79,2478.4 2878.26,2478.4 2877.67,2479 L1.2@2848,2479 F4.1@2848,2586 2911.01,2586 2912.01,2585 C16.1@2952.2,2585
NetC26_1: C26.1 U14.4 | length 124.1
  Top Layer w10: U14.4@1469.92,2420.61 1484.06,2420.61 1487.92,2416.76 1487.92,2402.61 1532.66,2357.87 1535.04,2357.87 1548,2344.92 C26.1@1548,2344 ; U14.4@1485.53,2420.61 U14.4@1489.39,2416.76
NetC27_1: C27.1 U14.6 | length 154.3
  Top Layer w12: C27.1@1635,2342.61 1635,2404.55 1673.93,2443.47 1674.85,2443.47 1677.58,2446.2 U14.6@1710.08,2446.2
NetC30_1: C30.1 U13.47 | length 133.4
  Top Layer w8: U13.47@2519.68,3037.06 2519.68,2991.28 2580.96,2930 C30.1@2581.94,2930
NetC31_1: C31.1 U13.31 | length 133
  Top Layer w8: C31.1@2038.53,3129 2124.64,3129 2125.21,3129.57 U13.31@2171.26,3129.57
NetD5_1: D5.1 R10.2 | length 76.8
  Top Layer w8: D5.1@2789.43,478 2789.43,513.3 2803.46,527.33 R10.2@2803.46,549
NetD6_1: D6.1 R11.1 | length 82.2
  Top Layer w15: D6.1@1739,777 1757.72,777 1758.28,777.57 R11.1@1821,777.57
NetD7_1: D7.1 R13.2 | length 77.2
  Top Layer w10: D7.1@824,785.43 878.84,785.43 879.33,785.91 R13.2@901,785.91
NetD8_1: D8.1 R12.1 | length 75.2
  Top Layer w10: R12.1@3063.43,2778 3063.43,2750.43 3064,2749.86 D8.1@3064,2703
NetD9_2: D9.2 Q1.1 R14.2 | length 134.2
  Top Layer w12: 2804.06,643.65 2805,642.72 R14.2@2805,624
  Top Layer w15: Q1.1@2803.57,757.63 2803.57,738.91 2804.06,738.42 D9.2@2804.06,687 2804.06,643.65
NetD10_1: D10.1 K1.5 Q2.3 | length 393
  Top Layer w10: D10.1@402.6,1320.76 402.6,1316.82 534.42,1185 K1.5@595,1185 596,1186 Q2.3@596,1326.63
NetF3_2: F3.2 Q1.3 | length 200.3
  Top Layer w25: Q1.3@2839,836.37 2962.22,836.37 2963,835.59 F3.2@3039,835.59
NetL1_1: L1.1 U7.5 | length 95.7
  Top Layer w20: L1.1@2848,2417.91 2877.67,2417.91 2891.97,2403.6 U7.5@2937.79,2403.6
"NetQ1 OUT_1": "Q1 OUT.1" U9.8 U11.2 | length 1007.2
  Top Layer w10: U11.2@1383,1775.71 1383,1757.98 1407.06,1733.91 1411.09,1733.91 v1(1413,1732) ; v1(1708,1733) 1723.14,1748.14 U9.8@1723.14,1758.23
  Bottom GND/Signal w10: v1(1413,1732) 1439,1706 1681,1706 v1(1708,1733) 1810.22,1630.78 1813.15,1627.85 1813.15,1623.71 1813.15,1622.25 ccw(c1865,1606) 1865,1551.66 2161.8,1551.66 2162.56,1550.91 2189.09,1550.91 2203,1537
NetR8_2: R8.2 R9.1 U5.1 | length 281.2
  Top Layer w15: U5.1@2470.51,578 2630.24,578 2630.33,578.09 R9.1@2652,578.09 2652,596.8 2651.54,597.26 R8.2@2651.54,677.54
NetR23_1: "SDC WDO.1" R23.1 R24.2 SW1.3 SW1.4 U14.2 | length 968.5
  Top Layer w10: SW1.3@1005.58,2598.05 SW1.4@1005.58,2853.95 ; 1313.5,2362.5 1345,2394 v1(1345,2471) 1373.28,2471.11 R24.2@1386,2471.49 ; R23.1@1411,2408.51 1411,2446.49 1399.7,2457.79 1398.72,2457.79 1386,2470.5 R24.2@1386,2471.49 ; U14.2@1469.92,2471.8 1437.43,2471.8 1437.12,2471.49 R24.2@1386,2471.49
  Bottom GND/Signal w10: SW1.3@1005.58,2598.05 1217.95,2598.05 v1(1345,2471)
NetR25_2: R25.2 U13.60 | length 69.5
  Top Layer w8: U13.60@2612.2,3326.43 2661.21,3326.43 2661.79,3327 R25.2@2681.49,3327
NetR28_2: R28.2 U15.3 | length 187.8
  Top Layer w12: R28.2@2090,2214 2150.83,2214 2221.83,2285 U15.3@2248.4,2285
NetR29_2: R29.2 U15.1 | length 116.6
  Top Layer w12: R29.2@2132,2385.51 2208.5,2385.51 2209.02,2385 U15.1@2248.4,2385
NetR32_2: R32.2 U15.5 | length 257.9
  Top Layer w10: U15.5@2248.4,2185 2275,2185 2352.98,2107.02 R32.2@2352.98,1986
NetR33_2: R33.2 U15.9 | length 142.1
  Top Layer w10: U15.9@2461,2135 2487.86,2135 cw(c2487.86,2125) 2494.91,2132.09 2561.28,2065.72 R33.2@2573.99,2061
"NetRST SW_1": "RST SW.1" U10.10 U10.11 U11.1 | length 283.7
  Top Layer w10: v1(1357,1706) 1445.41,1617.59 U10.10@1491.86,1617.59 U10.11@1491.86,1592 U10.11@1473.16,1592 ; v1@1357.41,1707.75 U11.1@1357.41,1775.71
NetTP14_1: TP14.1 U9.5 U10.4 U10.9 | length 694.9
  Top Layer w10: U9.5@1490.86,1809.41 1462.3,1809.41 1443,1790.11 1443,1659 1458.82,1643.18 U10.9@1491.86,1643.18 1644.4,1643.18 1695.58,1592 U10.4@1724.14,1592 1752.7,1592 1865,1479.7 TP14.1@1865,1468
NetTP16_1: TP16.1 U9.9 U10.5 | length 404.5
  Top Layer w10: U9.9@1723.14,1783.82 1692.82,1783.82 1651,1742 1651,1662.17 1695.58,1617.59 U10.5@1724.14,1617.59 ; U10.5@1725.62,1616.11 1854.89,1616.11 TP16.1@1865,1606
NetTP20_1: TP20.1 U9.1 U11.4 | length 233.9
  Top Layer w10: U11.4@1408.59,1864.29 1419.36,1864.29 1465.36,1910.3 1489.38,1910.3 U9.1@1490.86,1911.77 1490.86,1979.86 TP20.1@1536,2025
NetU12_2: U12.2 U12.3 | length 25.6
  Top Layer w8: U12.3@1841.26,2840.2 U12.2@1841.26,2865.8
NetU13_5: U13.5 U22.3 | length 109.1
  Top Layer w8: U22.3@2440.49,3577.72 2440.49,3539.96 2460,3520.45 2460,3478.63 U13.5@2460.63,3478 ; U13.5@2459.9,3446.4 U13.5@2460.63,3447.13
PC10: J4.5 U13.51 | length 740
  Top Layer w10: v1(2542,3123) 2568.26,3149.26 U13.51@2612.2,3149.26
  Bottom GND/Signal w10: v1(2542,3123) 2770,3123 3021,3374 J4.5@3021,3450
PC11: J4.3 U13.52 | length 587.1
  Top Layer w10: v1(2559.91,3170.69) 2561.31,3169.29 2611.86,3169.29 U13.52@2612.2,3168.94
  Bottom GND/Signal w10: v1(2559.91,3170.69) 2704.17,3170.69 2961.04,3427.56 2961.04,3430.82 2971,3440.77 J4.3@2971,3450
PC12: J4.1 U13.53 | length 417.1
  Top Layer w10: U13.53@2612.2,3188.63 2655.08,3188.63 2660.83,3194.38 v1(2663.54,3194.38)
  Bottom GND/Signal w10: v1(2663.54,3194.38) 2665.38,3194.38 J4.1@2921,3450
PC13: J4.2 U13.2 | length 491.6
  Top Layer w10: v1(2516.15,3426.03) 2518.07,3427.95 2518.07,3431.07 2519.68,3432.69 U13.2@2519.68,3478
  Power Plane w10: v1(2516.15,3426.03) 2678.33,3426.03 2752.3,3500 J4.2@2921,3500
  Bottom GND/Signal w10: v1(2516.15,3426.03) v1@2518.86,3426.03
PC14: J4.4 U13.3 | length 543.1
  Top Layer w10: U13.3@2500,3478 2500.35,3478.35 2500.35,3519.1 2500.78,3519.53 2500.78,3521.26 2510.48,3530.96 v1(2510.66,3530.96)
  Power Plane w10: v1(2510.66,3530.96) 2513.37,3530.96 2528.4,3546 2925,3546 J4.4@2971,3500
PC15: J4.6 U13.4 | length 710.3
  Top Layer w10: v1(2480.14,3531.42) 2480.23,3531.33 2480.23,3478.09 U13.4@2480.31,3478
  Power Plane w10: v1(2480.14,3531.42) 2480.14,3532.97 2579.08,3631.91 2918.55,3631.91 3021,3529.46 J4.6@3021,3500
  Bottom GND/Signal w10: v1(2480.14,3531.42) v1@2480.14,3532.97
ROTARY_1: C36.2 J1.B7 R31.2 R33.1 | length 2451.3
  Top Layer w10: R31.2@2568,2125 C36.2@2636,2125 R33.1@2636,2061 2687.61,2061 3116.06,1632.55 3237.09,1511.53 3237.09,186.47 J1.B7@3120,69.39
ROTARY_2: C35.2 J1.B6 R30.2 R32.1 | length 2335.8
  Top Layer w10: C35.2@2349,1918 R30.2@2414,1918 R32.1@2414,1986 2690,1986 3219.09,1456.91 3219.09,418.47 J1.B6@3120,319.39
ROTARY_3: C33.2 J1.B12 R27.2 R29.1 | length 2520.4
  Top Layer w12: R27.2@2053.98,2392 R27.2@2053,2392 C33.2@2053,2324 2112.8,2324 2113.28,2324.49 R29.1@2132,2324.49 2132,2273 v1(2131,2272)
  Bottom GND/Signal w12: v1(2131,2272) 2131,2198.94 2343.08,1986.86 2346.6,1983.34 2346.6,1071.56 ccw(c2389,1036) 2346.6,1000.44 2346.6,135.1 2295.2,83.69 J1.B12@2295.2,69.39
ROTARY_4: C32.2 J1.B1 R26.2 R28.1 | length 2062.3
  Top Layer w12: R28.1@2028.98,2214 2028.98,2167.72 R26.2@2029,2148 C32.2@2101,2148 2101.5,2147.5 2122.12,2147.5 2125.47,2144.15 2130.94,2144.15 v1(2132.47,2142.62)
  Bottom GND/Signal w12: v1(2132.47,2142.62) 2276,1999.1 2276,338.58 J1.B1@2295.2,319.39
SDC_IN: "SDC IN.1" J1.A8 K1.3 U21.10 | length 4858.3
  Top Layer w8: v1@1255,1508.75 1238,1525.75 1238,3238.86 cw(c1248,3238.86) 1240.9,3245.9 1360.03,3365.03 cw(c1367.12,3357.98) 1367.12,3367.98 U21.10@1477.83,3367.98
  Top Layer w10: v1(1255,1504) v1@1255,1508.75
  Top Layer w100: J1.A8@294.8,319.39 295,319.58 K1.3@295,485
  Bottom GND/Signal w10: K1.3@264.09,487.91 ccw(c271.14,495) 271.14,485 K1.3@295,485 123,657 123,1739 207,1823 936,1823 v1(1255,1504)
SDC_OUT: "SDC OUT.1" J1.A9 K1.2 | length 1468.9
  Top Layer w100: K1.2@295,785 459.76,620.24 J1.A9@459.76,319.39
  Bottom GND/Signal w10: 208,1684 208,872 K1.2@295,785
SWCLK: H1.4 U13.49 | length 256.3
  Top Layer w8: U13.49@2612.2,3109.89 2654.54,3109.89 2655.65,3111 H1.4@2868,3111
SWDIO: H1.2 U13.46 | length 428
  Top Layer w10: U13.46@2500,3037.06 2500,3079.54 2511.85,3091.39 2568.53,3091.39 2568.94,3090.98 2782.02,3090.98 2812,3061 H1.2@2868,3061
SWO: H1.6 U13.55 | length 283.5
  Top Layer w10: U13.55@2612.2,3228 2745,3228 2812,3161 H1.6@2868,3161
TS_SWITCH: J1.A1 U21.14 | length 3904.9
  Top Layer w10: J1.A1@954.65,69.39 885.95,138.09 786.91,138.09 716,209 716,1238.91 1105.78,1628.69 1105.78,3011.89 ccw(c1061,3012) 1105.78,3012.27 1105,3185.86 ; v1(1074.92,3220.13) 1087.53,3212.65 1101,3199.18 1105,3185.9 ; v1(1386.56,3225.84) 1426.33,3265.61 U21.14@1477.83,3265.61
  Bottom GND/Signal w10: v1@1075.64,3220.13 v1(1074.92,3220.13) 1077.62,3220.13 1083.34,3225.84 v1(1386.56,3225.84)
WDG_CTL: "WDG CTL.1" U13.35 U14.7 | length 1409.1
  Top Layer w8: U14.7@1710.08,2471.8 1779.8,2471.8 v1(1854,2546) 1861.72,2546.02 ccw(c1861.67,2554.02) 1867.33,2548.36 2281.15,2964.14 ccw(c2275.46,2969.77) 2283.46,2969.77 U13.35@2283.46,3037.06
  Bottom GND/Signal w8: v1(1854,2546) 1867,2559 1867,3101
pads on no net: D10.2 H1.7 H1.9 J1. K1.1 U9.6 U10.1 U10.2 U10.3 U13.6 U13.8 U13.9 U13.10 U13.11 U13.14 U13.17 U13.25 U13.26 U13.27 U13.30 U13.41 U13.43 U13.54 U13.56 U13.59 U13.61 U13.62 U15.10 U15.11 U15.12 U15.13 U16.5 U17.5 U18.5 U18.6 U18.10 U18.11 U18.12 U18.13 U18.14 U19.12 U20.12 U21.12

## Polygon pours and split planes (outlines as drawn)
GND on Bottom GND/Signal "GND_B" (solid, pour order 31): -96,-172 -96,3512 403,4011 3111,4011 3481,3641 3481,-172
GND on Top Layer "GND Pour around Signals" (solid, pour order 32): 0,3906 3287.4,3906 3287.4,-23 0,-23

## Silkscreen, mask and mechanical layers (free items; w line width, h text height)
Top Overlay:
  drawing of 122 lines, arcs and shapes, not listed
  text "MICRO RESET" at 2951,3734.95 h60 r270
  text "MICRO / CONTROLLER" at 2067.85,3719.99 h60
  text "LLC UP/DOWN" at 1791,3476.31 h60 r270
  text "ISP HEADER" at 2866.32,3308 h60
  text "CAN LAND" at 714.34,3242 h60
  text "Anh Tran" at -28.31,3130 h70
  text "Anhadh Virk" at 7.69,3079 h70
  text "Alignment's for nerd" at 1412,3036 h30 r270
  text "Ethan Ney" at -11.31,3028 h70
  text "Sanya Arora" at 5.69,2974 h70
  text "SUPERVISOR RESET" at 753,2576.93 h60 r90
  text "NON PROGRAMMABLE LOGIC" at 1588.37,2078.63 h60
  text "\"Shut up and eat your rice\"" at 846,1995 h20
  text "ROTR" at 2483,1964.98 h60 r270
  text "DFMM v4.1" at 408.01,1884.41 h150
  text "2025" at 389.67,1777 h100
  text "INPUT PROTECTION" at 2612.07,1368.34 h60
  text "We're so back besties" at 1799,1152 h60
  text "POWER IC" at 1327.5,979 h60
  text "12V" at 262,212.66 h60
  text "GND" at 2319,168.74 h80
  text "12V" at 2674,168.22 h80
  text "24V" at 2979.78,152 h80 r90
  text "GND" at 3140.26,136 h80 r90
  text "12V" at 838,126.66 h60
Bottom Overlay:
  drawing of 5128 lines, arcs and shapes, not listed
  text "James Larking" at 1425,673 h100
  text "ASSI TX" at 598,375.8 h50 r270
  text "SDC OUT" at 434,372 h50 r270
  text "ROTR 2" at 3094,368.5 h50 r270
  text "CAN1 L" at 100,359 h50 r270
  text "ROTR 4" at 2263,356 h50 r270
  text "ASMS" at 2590,353 h50 r270
  text "ANL 1" at 756,351 h50 r270
  text "+24V" at 2923,347 h50 r270
  text "ANL 2" at 927,346 h50 r270
  text "GND" at 2427,343 h50 r270
  text "BMS" at 2755,342 h50 r270
  text "SDC IN" at 189,282 h50 r270
  text "CAN2 L" at 433,125.5 h50 r270
  text "CAN2 H" at 280,124 h50 r270
  text "CAN1 H" at 114,122 h50 r270
  text "ROTR 1" at 3096,118 h50 r270
  text "TS SW" at 929,116 h50 r270
  text "ROTR 3" at 2262,113.5 h50 r270
  text "GND" at 2438,113 h50 r270
  text "AS SDC" at 766,112 h50 r270
  text "EBS_LED" at 553,106 h50 r270
  text "BSPD" at 2756,99 h50 r270
  text "IMD" at 2596,93 h50 r270
  text "+24V" at 2922,91 h50 r270